# Altium PCB PCI Express Mini L1.PCBDOC (part 7 of 7)
Units mm, origin at the board's own origin, x right, y up, seen from the top; angles counter-clockwise.
Board outline 70 x 83.2 mm, 6 copper layers (TopLayer, Layer 1, Layer 2, Layer 3, Layer 4, Bottom Layer), stack 0.914 mm thick; 402 components, 242 nets, 1301 pads, 522 vias.
Unrouted connection lines stored in the file: 225.
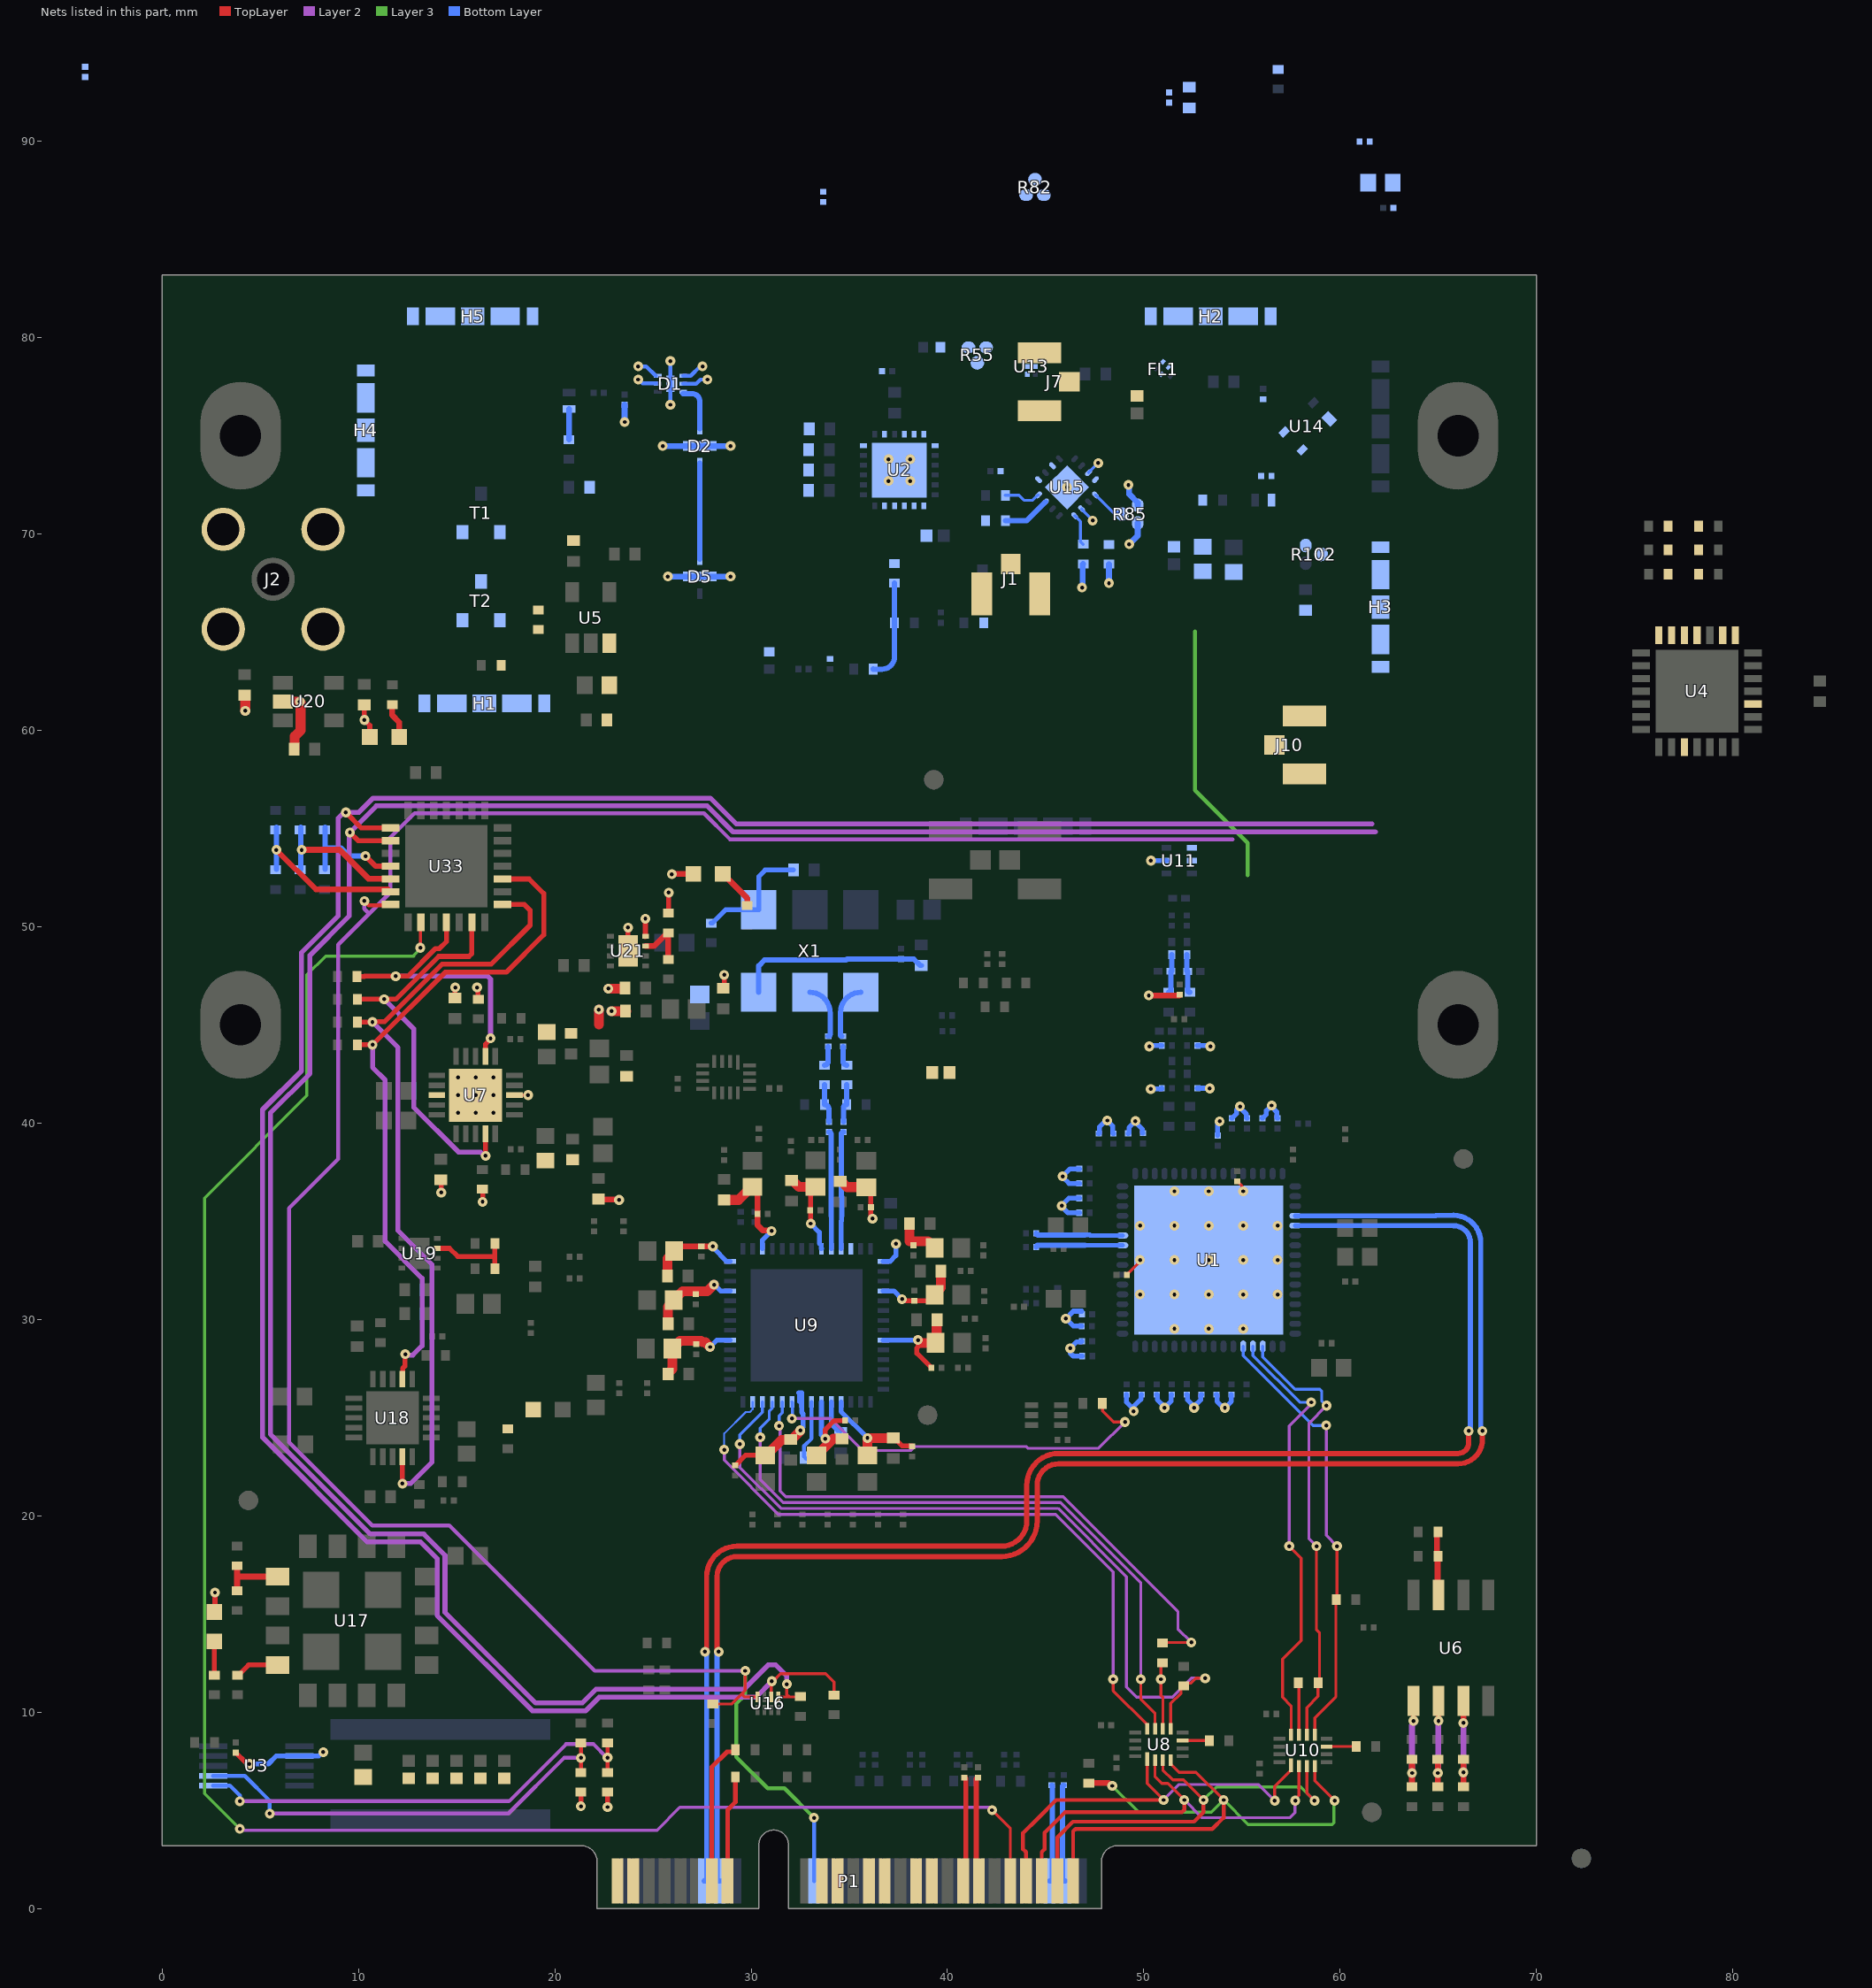
[diagram p8: the nets of this part, all layers, seen from the top]

## Via types
v1: diameter 0.5, hole 0.2, TopLayer to Bottom Layer, tented both sides, 311 vias
v2: diameter 0.5, hole 0.2, TopLayer to Bottom Layer, 211 vias

## Nets (pads, with @x,y where several pads share a name; then routed paths per layer and width w, separated by ;. In a path a pad name is that pad's centre, name@x,y a point inside that pad or via, vN(x,y) a via of type N, cw(c..) or ccw(c..) an arc to the next point about the centre after c; other vN are vias at no path point) (continued)
NetC172_1: C172.1 U9.7 | length 3.1
  Bottom Layer w0.2: C172.1@32.803,22.912 32.701,23.013 32.701,23.53 32.701,23.556 33.081,23.936 U9.7@33.081,25.8
NetC173_1: C173.1 U9.5 | length 1.8
  Bottom Layer w0.25: U9.5@34.081,25.8 34.081,24.674 34.402,24.353 C173.1@34.552,24.353
  Bottom Layer w0.279: C173.1@34.552,24.353 C173.1@34.581,24.381
NetC175_2: C175.2 R90.1 | length 1.1
  Bottom Layer w0.268: C175.2@34.681,43.901 34.681,43.147 ccw(c34.876,43.147) R90.1@34.876,42.952
NetC176_1: C176.1 R79.1 R90.2 | length 2
  Bottom Layer w0.268: C176.1@34.706,40.063 34.706,40.778 cw(c34.866,40.778) R79.1@34.866,40.937 34.866,41.952 R90.2@34.876,41.952
NetC178_2: C178.2 R91.1 | length 1.1
  Bottom Layer w0.268: R91.1@33.733,42.954 ccw(c33.733,43.15) 33.928,43.15 C178.2@33.928,43.901
NetC179_1: C179.1 R84.2 R91.2 | length 2
  Bottom Layer w0.268: R91.2@33.733,41.954 R84.2@33.733,40.937 cw(c33.733,40.709) 33.961,40.709 C179.1@33.961,40.063
NetC259_2: C259.2 L3.2 R102.2 U14.3
NetD1_6: D1.6 D2.3 | length 2.5
  Bottom Layer w0.268: 26.533,77.142 26.983,77.142 cw(c26.983,76.735) 27.39,76.735 D2.3@27.39,75.35
NetD2_1: D2.1 D5.3 | length 4.9
  Bottom Layer w0.268: D5.3@27.39,68.708 D2.1@27.39,73.6
NetD3_1: D3.1 R77.1 | length 2.1
  TopLayer w0.3: D3.1@28.563,52.693 29.801,51.455 R77.1@29.801,51.08
NetD4_1: D4.1 R76.1 | length 1.8
  TopLayer w0.3: R76.1@11.724,61.315 11.724,60.767 12.082,60.409 D4.1@12.082,59.659
NetD7_1: D7.1 R80.1 | length 1.7
  TopLayer w0.25: R80.1@2.664,11.885 2.664,13.598 D7.1@2.669,13.603
NetD8_1: D8.1 R78.1
NetJ1_2: J1.2 R100.1
NetJ7_2: J7.2 R55.3
NetJ10_2: J10.2 R102.3
NetL1_2: L1.2 R55.1
NetL2_2: L2.2 R31.2 | length 1.6
  Bottom Layer w0.3: R31.2@20.723,74.803 L2.2@20.723,76.368
NetR1_2: R1.2 R2.1 R5.2 | length 2
  Bottom Layer w0.268: R2.1@51.375,46.775 R5.2@51.375,47.729 ; R5.2@51.42,47.774 R1.2@51.42,48.573
  Bottom Layer w0.269: R2.1@51.259,46.658 ccw(c51.259,46.775) R2.1@51.375,46.775 ; R5.2@51.375,47.729 ccw(c51.375,47.774) R5.2@51.42,47.774
NetR9_1: R9.1 R10.2 R11.1 | length 2
  Bottom Layer w0.268: R9.1@52.195,47.758 R10.2@52.195,48.573 ; R11.1@52.229,46.773 R9.1@52.229,47.724
  Bottom Layer w0.269: R9.1@52.195,47.758 ccw(c52.229,47.758) R9.1@52.229,47.724 ; R11.1@52.229,46.773 ccw(c52.343,46.773) R11.1@52.343,46.658
NetR18_1: R18.1 U10.7 | length 1.5
  TopLayer w0.15: U10.7@59.303,8.253 R18.1@60.809,8.253
NetR19_1: R19.1 R53.2 U19.3 | length 4.4
  TopLayer w0.25: U19.3@14.017,33.619 14.644,33.619 15.056,33.208 16.946,33.208 ; R19.1@16.946,32.582 16.946,33.208 ; R53.2@16.946,33.871 16.946,33.208
NetR20_2: R20.2 R27.1 U6.7 | length 3.2
  TopLayer w0.3: R20.2@64.923,19.175 64.923,17.943 64.964,17.902 64.964,16.016 U6.7@65.005,15.975
NetR21_1: R21.1 R119.2 U6.3 | length 5.1
  TopLayer w0.3: R119.2@66.275,6.195 v1(66.275,6.935) R21.1@66.275,7.608 ; v1(66.275,9.454) U6.3@66.275,10.575
  Layer 2 w0.3: v1(66.275,6.935) v1(66.275,9.454)
NetR22_1: R22.1 R28.2 U4.13
NetR23_1: R23.1 R25.2 U4.11
NetR24_1: R24.1 R26.2 U4.12
NetR29_2: R29.2 U10.11 | length 2.6
  TopLayer w0.15: U10.11@57.903,8.853 R29.2@57.903,11.492
NetR30_1: R30.1 R35.2 U33.13 | length 8.7
  TopLayer w0.279: v1(5.821,53.914) 7.837,51.898 11.513,51.898 U33.13@11.632,51.779
  Bottom Layer w0.279: R30.1@5.823,52.934 v1(5.821,53.914) ; v1@5.823,53.998 R35.2@5.823,55.061
NetR32_2: R32.2 T2.1 U5.3
NetR33_1: R33.1 R47.2 U33.11 | length 5.8
  TopLayer w0.279: v2(10.361,53.598) 10.88,53.079 U33.11@11.632,53.079
  Bottom Layer w0.279: R33.1@8.308,52.934 8.308,53.998 ; R47.2@8.308,55.061 8.308,53.998 ; v2(10.361,53.598) 9.517,53.598 9.118,53.998 8.308,53.998
NetR34_1: R34.1 R45.2 U33.12 | length 7.2
  TopLayer w0.3: v1(7.112,53.914) 9.045,53.914 10.515,52.444 11.617,52.444 U33.12@11.632,52.429
  Bottom Layer w0.279: R34.1@7.064,52.934 v1@7.064,53.914 ; v1@7.064,53.998 R45.2@7.064,55.061
NetR40_2: R40.2 R81.1 R86.1 | length 5.2
  Bottom Layer w0.268: R40.2@36.227,63.12 36.227,63.115 36.677,63.115 ccw(c36.677,63.74) 37.302,63.74 R86.1@37.302,65.475 R81.1@37.302,67.493
NetR49_2: R49.2 T1.1 T2.3
NetR54_1: R54.1 R70.2 U6.1 | length 5.1
  TopLayer w0.25: v1(63.735,9.558) U6.1@63.735,10.575
  TopLayer w0.3: R70.2@63.656,6.195 v1(63.656,6.902) R54.1@63.656,7.608
  Layer 2 w0.3: v1(63.656,6.902) 63.656,9.321 63.735,9.4 v1(63.735,9.558)
NetR55_2: R55.2 U13.5
NetR56_1: R56.1 R68.2 U21.3 | length 2.8
  TopLayer w0.3: U21.3@24.631,49.009 25.056,49.009 25.731,49.684 R68.2@25.781,49.684 R56.1@25.781,48.334
NetR61_1: R61.1 R63.2 U17.13 | length 3.4
  TopLayer w0.2: R63.2@3.827,16.131 R63.2@3.827,16.181 ; R61.1@3.827,17.456 R61.1@3.827,17.506
  TopLayer w0.3: R63.2@3.827,16.181 R61.1@3.827,17.456 ; 3.828,16.935 3.86,16.903 U17.13@5.88,16.903
NetR62_1: R62.1 U17.16 | length 2.3
  TopLayer w0.25: R62.1@3.842,11.885 3.892,11.885 4.41,12.403 U17.16@5.88,12.403
NetR69_1: R69.1 R71.2 U6.2 | length 5.1
  TopLayer w0.25: v1(65.005,9.558) U6.2@65.005,10.575
  TopLayer w0.3: R71.2@64.973,6.195 v1(64.973,6.902) R69.1@64.973,7.608
  Layer 2 w0.3: v1(64.973,6.902) 64.989,6.918 64.989,9.438 65.005,9.454 v1(65.005,9.558)
NetR74_1: R74.1 U9.9 | length 21
  TopLayer w0.15: R74.1@47.893,25.724 47.893,25.336 48.452,24.777 v1(49.043,24.777)
  Layer 2 w0.15: v1(32.077,24.951) 34.04,24.951 35.666,23.326 38.15,23.326 38.354,23.53 43.999,23.53 44.09,23.439 47.705,23.439 v1(49.043,24.777)
  Bottom Layer w0.15: U9.9@32.081,25.8 32.104,25.777 v1@32.104,24.928
NetR75_1: R75.1 U9.10 | length 30.8
  TopLayer w0.15: R75.1@50.955,13.519 50.987,13.551 v1(52.42,13.551)
  Layer 2 w0.15: v2(31.426,24.58) 31.476,24.531 31.476,23.53 31.476,21.261 31.762,20.975 45.885,20.975 51.734,15.126 51.734,14.236 v1(52.42,13.551)
  Bottom Layer w0.15: v2(31.426,24.58) 31.426,25.095 31.581,25.25 U9.10@31.581,25.8
NetR81_2: R81.2 U2.4
NetR93_1: R93.1 R103.1 U15.16 | length 1.6
  Bottom Layer w0.15: U15.16@46.478,70.925 46.771,70.632 46.771,69.616 R93.1@46.913,69.475
NetR100_2: R100.2 U15.3 | length 2.4
  Bottom Layer w0.268: R100.2@42.944,70.681 44.042,70.681 U15.3@44.993,71.632
NetR106_2: R106.2 U15.4 | length 1.9
  Bottom Layer w0.15: R106.2@42.944,71.964 43.644,71.964 43.895,71.713 44.345,71.713 44.618,71.986 U15.4@44.639,71.986
NetR111_2: R111.2 R129.1 U3.2 | length 22.6
  TopLayer w0.2: R129.1@21.333,6.925 v2(21.333,7.673) R111.2@21.333,8.444
  Layer 2 w0.2: v2(5.488,4.839) 17.639,4.839 20.473,7.673 v2(21.333,7.673)
  Bottom Layer w0.2: U3.2@2.605,6.763 2.611,6.757 4.217,6.757 5.488,5.486 v2(5.488,4.839)
NetR112_2: R112.2 R130.1 U3.1 | length 23.7
  TopLayer w0.2: R130.1@22.691,6.875 R130.1@22.691,6.925 v2(22.691,7.684) R112.2@22.691,8.444 R112.2@22.691,8.494
  Layer 2 w0.2: v2(3.965,5.463) 17.674,5.463 20.579,8.369 21.975,8.369 22.66,7.684 v2(22.691,7.684)
  Bottom Layer w0.2: U3.1@2.605,6.263 3.46,6.263 3.965,5.758 v2(3.965,5.463)
NetR145_1: R145.1 U8.7 | length 1.4
  TopLayer w0.15: U8.7@51.97,8.558 53.332,8.558 R145.1@53.337,8.553
O1_N: C189.2 P1.48 | length 5
  Bottom Layer w0.268: P1.48@45.2,1.4 ccw(c45.2,1.536) 45.336,1.536 45.336,6.253 ccw(c45.306,6.253) C189.2@45.306,6.283
O1_P: C188.2 P1.50 | length 5
  Bottom Layer w0.268: C188.2@45.93,6.283 ccw(c45.93,6.218) 45.864,6.218 45.864,1.536 ccw(c46,1.536) P1.50@46,1.4
O3_N: C227.2 P1.39 | length 5.6
  TopLayer w0.268: P1.39@41.469,1.531 ccw(c41.6,1.531) P1.39@41.6,1.4 cw(c41.6,1.536) 41.464,1.536 41.464,6.573 cw(c41.564,6.573) C227.2@41.564,6.673
O3_P: C228.2 P1.37 | length 5.4
  TopLayer w0.268: P1.37@40.8,1.4 ccw(c40.8,1.536) 40.936,1.536 40.936,6.587 ccw(c40.85,6.587) C228.2@40.85,6.673
O8_N: C185.2 U1.59 | length 4.5
  Bottom Layer w0.24: 47.006,34.303 47.234,34.303 cw(c47.234,34.275) 47.262,34.275 U1.59@48.908,34.275
  Bottom Layer w0.268: C185.2@44.518,34.389 ccw(c44.604,34.389) 44.604,34.303 47.006,34.303
O8_P: C183.2 U1.58 | length 4.4
  Bottom Layer w0.24: 47.006,33.775 U1.58@48.908,33.775
  Bottom Layer w0.268: C183.2@44.518,33.693 cw(c44.6,33.693) 44.6,33.775 47.006,33.775
OSCIN_N: C179.2 U9.38 | length 6
  Bottom Layer w0.24: U9.38@34.081,33.6 34.081,35.262
  Bottom Layer w0.268: C179.2@33.961,39.543 cw(c33.961,39.435) 34.07,39.435 34.07,35.66 ccw(c34.109,35.66) 34.081,35.632 34.081,35.262
OSCIN_P: C176.2 U9.39 | length 6
  Bottom Layer w0.24: U9.39@34.581,33.6 34.581,35.006 ccw(c34.581,35.034) 34.609,35.034 34.609,35.262
  Bottom Layer w0.268: 34.609,35.262 34.609,36.242 ccw(c34.57,36.242) 34.598,36.27 34.598,39.435 cw(c34.706,39.435) C176.2@34.706,39.543
PER0_N: P1.21
PER0_P: P1.19
PER1_N: P1.27
PER1_P: P1.25
PER2_N: P1.33
PER2_P: P1.31
PERST2#: P1.43 U33.16 | length 97
  TopLayer w0.15: v1(13.154,48.928) 13.168,48.942 13.168,50.215 U33.16@13.182,50.229 ; v1(42.268,5.01) 42.288,5.01 43.2,4.098 P1.43@43.2,1.4
  Layer 2 w0.15: v1(3.965,4.057) 4.033,3.99 25.21,3.99 26.37,5.15 42.128,5.15 v1(42.268,5.01)
  Layer 3 w0.15: v1(3.965,4.057) 2.172,5.851 2.172,36.186 7.377,41.392 7.377,47.547 8.335,48.504 12.837,48.504 12.837,48.573 13.154,48.89 v1(13.154,48.928)
PERST#: P1.18 R72.2 U4.14 U16.8 U33.14 | length 137.5
  TopLayer w0.15: R72.2@28.05,10.419 29.017,10.419 29.517,10.92 29.587,10.849 ; v1(29.701,12.107) 29.7,12.105 29.7,11.103 29.587,10.99 29.587,10.849 ; U16.8@30.326,10.779 29.657,10.779 29.587,10.849
  TopLayer w0.2: v1(10.304,51.309) 10.526,51.087 11.591,51.087 U33.14@11.632,51.129
  Layer 2 w0.2: v1(10.304,51.309) 10.304,50.911 10.552,50.663 ; v1(29.701,12.107) 22.031,12.107 14.634,19.504 10.706,19.504 6.475,23.736 6.475,35.667 8.977,38.169 8.977,49.088 10.552,50.663 ; 54.515,54.452 28.919,54.452 27.597,55.774 12.86,55.774 11.632,54.547 11.632,51.744 10.552,50.663
  Layer 3 w0.2: v1(29.701,12.107) 29.701,10.881 29.236,10.416 29.236,7.726 30.84,6.123 31.704,6.123 v1(33.201,4.625) ; 52.603,65.036 52.603,56.947 55.286,54.264 55.286,52.63
  Bottom Layer w0.2: P1.18@33.2,1.4 33.201,1.401 v1(33.201,4.625)
PG_1V8_1: R52.2 U18.17 U33.24 | length 35.1
  TopLayer w0.25: R52.2@9.977,43.984 v2(10.721,43.984) 14.424,47.687 17.542,47.687 19.438,49.583 19.438,51.688 18.696,52.429 U33.24@17.332,52.429 ; U18.17@12.242,26.962 12.257,26.977 12.257,27.515 12.367,27.625 12.367,28.208 v1(12.388,28.23)
  Layer 2 w0.25: v2(10.721,43.984) 10.721,42.833 11.363,42.191 11.363,33.973 13.242,32.094 13.242,28.659 12.769,28.186 12.433,28.186 v1(12.388,28.23)
PG_1V25_0: R37.2 U7.17 U33.18 | length 15.2
  TopLayer w0.25: R37.2@9.961,47.48 9.971,47.471 10.306,47.471 10.315,47.48 12.52,47.48 13.927,48.887 14.131,48.887 14.482,49.239 U33.18@14.482,50.229 ; U7.17@16.47,43.398 16.47,44.007 16.732,44.269 v2(16.732,44.31)
  Layer 2 w0.25: v2(11.898,47.48) 16.586,47.48 16.732,47.334 v2(16.732,44.31)
PG_2V5_0: R38.2 U7.9 U33.20 | length 20.3
  TopLayer w0.25: R38.2@9.977,46.306 v2(11.316,46.306) 11.911,46.306 14.093,48.487 15.636,48.487 15.782,48.634 U33.20@15.782,50.229 ; U7.9@16.47,39.448 16.474,39.444 16.474,38.336 v2(16.478,38.332)
  Layer 2 w0.25: v2(11.316,46.306) 12.818,44.804 12.818,40.804 15.098,38.523 16.22,38.523 16.411,38.332 v2(16.478,38.332)
PG_3V3_1: R42.2 U18.9 U33.22 | length 40.1
  TopLayer w0.25: R42.2@9.974,45.148 v2(10.718,45.148) 10.741,45.171 11.343,45.171 14.259,48.087 16.763,48.087 18.749,50.074 18.749,50.836 18.456,51.129 U33.22@17.332,51.129 ; U18.9@12.242,23.012 12.244,23.01 v1(12.244,21.641)
  Layer 2 w0.25: v2(10.718,45.148) 12.019,43.846 12.019,34.525 13.741,32.803 13.741,22.721 12.661,21.641 v1(12.244,21.641)
PGND: C37.1 C44.1 C48.1 C60.1 C70.1 D7.2 FB5.1 FB6.1 FB11.1 FB13.1 FB14.1 FB30.1 P1.1 P1.3 R129.2 R130.2 U3.7 | length 8.2
  TopLayer w0.25: D7.2@2.669,15.103 2.697,15.131 v1(2.697,16.094) ; C44.1@3.752,7.935 3.762,7.935 4.286,7.411 4.397,7.411 v1(4.445,7.363) ; v2(21.333,5.206) R129.2@21.333,5.925 ; v2(22.691,5.168) R130.2@22.691,5.925
  TopLayer w0.5: v1(4.24,60.996) C60.1@4.24,61.747
  Bottom Layer w0.25: v1(4.445,7.363) 5.413,7.363 5.813,7.763 U3.7@7.005,7.763 7.976,7.763 8.179,7.966 v1@8.246,7.966
  other v1: 8.212,7.966
Q: R85.3 U4.24 U15.13 | length 1.8
  Bottom Layer w0.15: U15.13@47.538,71.986 48.452,71.073 48.832,71.073 R85.3@48.898,71.006
Q\: R39.1 R82.3 U2.19 U15.12
RFGND: C1.2 C2.2 C4.1 C7.1 C8.1 C9.1 C10.1 C11.2 C12.2 C13.2 C14.2 C24.1 C26.1 C27.1 C30.1 C31.1 C33.1 C42.1 C46.1 C47.2 C51.2 C61.1 C63.1 C66.1 C67.1 C68.1 C69.1 C71.1 C72.1 C77.1 C78.1 C83.2 C84.1 C85.1 C99.1 C100.1 C101.1 C102.1 C103.1 C104.1 C105.1 C106.1 C107.1 C108.1 C109.1 C110.1 C111.1 C113.1 C114.1 C115.1 C116.1 C117.1 C118.1 C119.1 C120.1 C121.1 C122.1 C123.1 C124.1 C125.1 C252.1 C253.1 C256.1 C257.1 C258.1 C259.1 D1.2 D1.3 D1.4 D1.5 D1.7 D2.2 D3.2 D4.2 D5.2 FB11.2 FL1.B FL1.C FL1.E H1.1 H2.1 H3.1 H4.1 H5.1 J1.1 J1.3 J2.MH J7.1 J7.3 J10.1 J10.3 L4.1 R58.1 R60.1 R68.1 R82.1 R85.1 R87.1 R88.2 R103.2 T1.2 T2.2 U1.65 U2.1 U2.3 U2.5 U2.12 U2.14 U2.16 U2.17 U2.18 U2.25 U7.3 U7.13 U7.21 U11.2 U11.5 U13.1 U13.4 U14.2 U14.4 U15.11 U15.17 U20.2 U21.4 U21.9 | length 62
  TopLayer w0.15: v1(10.304,60.526) v1@10.421,60.409 ; U7.13@17.945,41.423 v1(18.64,41.423) ; C121.1@49.128,32.275 49.128,32.285 49.808,32.965 v2(49.808,33.025) ; C69.1@54.753,37.027 54.763,37.027 54.991,36.798 54.991,36.592 v2(55.058,36.525)
  TopLayer w0.25: v1(10.304,60.526) C61.1@10.304,61.29 ; v1@10.421,60.409 10.582,60.248 D4.2@10.582,59.659 ; v2(14.218,36.462) 14.22,36.464 14.22,37.063 C51.2@14.227,37.071 ; C47.2@14.916,46.368 14.924,46.376 14.924,46.897 v2(14.932,46.905) ; v2(16.045,46.905) 16.081,46.869 16.081,46.343 R58.1@16.116,46.307 ; v2(16.327,35.989) 16.334,35.996 16.334,36.596 R60.1@16.341,36.603 ; U21.9@23.729,49.046 23.73,49.048 v2(23.732,49.96) v2(23.732,49.96) ; U21.4@24.614,49.496 24.615,49.498 24.615,50.408 v2(24.617,50.41) ; R68.1@25.803,50.82 25.805,50.821 25.805,51.732 v2(25.806,51.734) ; C78.1@28.613,46.8 28.631,46.818 v2(28.631,47.549)
  TopLayer w0.3: C68.1@22.227,36.133 22.25,36.11 23.254,36.11 v2(23.276,36.088) ; v1(25.962,52.668) 25.975,52.68 27.05,52.68 D3.2@27.063,52.693 ; v2(50.25,46.5) 51.785,46.5 ccw(c51.785,46.54) C4.1@51.822,46.526
  TopLayer w0.5: U20.2@6.268,61.462 v1(7.019,61.462) 7.058,61.422 7.058,59.996 6.755,59.693 6.755,59.074 C63.1@6.73,59.049 ; 22.246,45.03 v1(22.246,45.781) ; v1(22.726,46.851) C66.1@23.477,46.851 ; v1(22.891,45.702) C77.1@23.642,45.702
  Bottom Layer w0.15: U15.11@47.185,73.117 v1(47.68,73.612)
  Bottom Layer w0.2: v1(24.249,77.861) 24.277,77.861 24.461,77.677 D1.2@25.21,77.677 ; v1(24.249,78.532) 24.654,78.532 D1.3@25.14,78.047 ; v1(25.89,76.577) D1.7@25.89,77.647 v1(25.89,78.8) ; D1.5@26.54,77.647 27.204,77.647 27.418,77.861 v1(27.775,77.861) ; D1.4@26.54,78.047 26.927,78.047 27.412,78.532 v1(27.525,78.532)
  Bottom Layer w0.25: v1(45.821,35.784) v1@45.798,35.784 ; C116.1@46.717,35.432 46.133,35.432 45.782,35.784 v1@45.798,35.784 ; C102.1@46.717,36.178 46.192,36.178 v1@45.798,35.784 ; C100.1@46.717,36.924 46.192,36.924 45.863,37.252 v1(45.863,37.287) 46.245,37.669 C113.1@46.717,37.669 ; C99.1@46.836,29.656 46.412,29.656 v1(46.029,30.04) 46.409,30.419 C118.1@46.847,30.419 ; C101.1@46.847,28.893 46.847,28.883 46.822,28.858 46.581,28.858 v1(46.253,28.53) 46.253,28.289 46.409,28.133 C117.1@46.857,28.133 ; C114.1@47.698,39.472 47.708,39.472 47.733,39.497 47.733,39.794 48.068,40.128 v1(48.135,40.128) 48.419,39.845 48.419,39.493 48.444,39.468 C115.1@48.454,39.468 ; C120.1@49.116,26.172 49.116,25.789 v1@49.425,25.481 ; C103.1@49.204,39.473 49.214,39.473 49.239,39.498 49.239,39.767 v1(49.574,40.102) 49.574,40.034 49.915,39.692 49.915,39.505 49.94,39.48 C125.1@49.95,39.48 ; v1(49.484,25.321) 49.436,25.369 49.436,25.47 v1@49.425,25.481 ; C119.1@49.887,26.172 49.877,26.172 49.852,26.147 49.852,25.937 49.425,25.51 v1@49.425,25.481 ; v1(50.275,43.901) cw(c50.323,43.901) 50.323,43.949 C1.2@50.916,43.949 ; v1(50.35,41.736) 50.878,41.736 ccw(c50.878,41.775) C2.2@50.916,41.775 ; C111.1@50.652,26.176 50.662,26.176 50.687,26.151 50.687,25.924 51.05,25.56 v1(51.05,25.5) 51.379,25.828 51.379,26.144 51.404,26.169 C123.1@51.414,26.169 ; C122.1@52.183,26.181 52.193,26.181 52.218,26.156 52.218,25.908 v1@52.558,25.567 ; v1(52.558,25.5) v1@52.558,25.567 ; C8.1@52.726,41.775 53.354,41.775 v1(53.354,41.763) ; C7.1@52.726,43.949 53.343,43.949 cw(c53.343,43.901) v1(53.391,43.901) ; C108.1@52.938,26.176 52.928,26.176 52.903,26.151 52.903,25.912 v1@52.558,25.567 ; C109.1@53.697,26.172 53.7,26.172 53.725,26.147 53.725,25.832 54.057,25.5 v1(54.125,25.5) 54.13,25.5 54.459,25.829 C110.1@54.459,26.169 ; C124.1@53.76,39.366 53.76,39.971 53.857,40.068 v1(53.857,40.091) ; C104.1@54.483,40.243 54.493,40.243 54.72,40.47 54.72,40.666 v1(54.901,40.846) 54.901,40.779 55.223,40.456 55.223,40.268 55.248,40.243 C105.1@55.258,40.243 ; C106.1@56.033,40.243 56.043,40.243 56.241,40.441 56.241,40.63 v1(56.507,40.896) 56.507,40.828 56.773,40.561 56.773,40.268 56.798,40.243 C107.1@56.808,40.243
  Bottom Layer w0.268: v2(50.356,53.364) U11.5@51.148,53.364
  Bottom Layer w0.3: v1(23.56,75.7) C252.1@23.56,76.577 ; v1(25.499,74.475) D2.2@27.39,74.475 v1(28.95,74.475) ; v1(25.757,67.833) D5.2@27.39,67.833 v1(28.95,67.833) ; v1@25.89,76.494 v1(25.89,76.577) ; v1(48.225,67.493) R103.2@48.225,68.462 ; v1(49.216,72.493) 49.254,72.455 49.254,72.019 49.686,71.587 R85.1@49.686,71.456
  other v1: 46.089,72.375
  other v2: 51.558,29.525 53.308,29.525 55.058,29.525 49.808,31.275 51.558,31.275 53.308,31.275 55.058,31.275 56.808,31.275 51.558,33.025 53.308,33.025 55.058,33.025 56.808,33.025 49.808,34.775 51.558,34.775 53.308,34.775 55.058,34.775 56.808,34.775 51.558,36.525 53.308,36.525 15.07,40.523 15.97,40.523 16.87,40.523 15.07,41.423 15.97,41.423 16.87,41.423 15.07,42.323 15.97,42.323 16.87,42.323 37.002,72.7 38.102,72.7 37.002,73.8 38.102,73.8
RST: U4.3 U15.15 | length 0.8
  Bottom Layer w0.15: U15.15@46.831,71.279 46.831,71.261 47.397,70.695 v1(47.397,70.677)
SCK: R44.1 U4.8 U16.6 U33.8 | length 129
  TopLayer w0.15: U16.6@31.026,10.779 v1@31.026,11.478 ; v1(31.052,11.576) 31.026,11.55 v1@31.026,11.478 ; v1@31.087,11.54 31.501,11.953 ; R44.1@34.221,10.874 34.221,11.526 33.794,11.953 31.501,11.953 ; v1@31.026,11.478 31.501,11.953
  TopLayer w0.25: v1(9.361,55.819) 10.152,55.029 U33.8@11.632,55.029
  Layer 2 w0.25: v1(31.052,11.576) 30.239,10.763 22.261,10.763 21.566,10.068 18.867,10.068 14.012,14.922 14.012,17.821 13.164,18.669 10.446,18.669 5.12,23.994 5.12,40.68 7.104,42.664 7.104,48.683 8.978,50.557 8.978,55.533 9.25,55.804 9.346,55.804 v1(9.361,55.819) 10.022,55.819 10.752,56.549 27.927,56.549 29.248,55.227 61.619,55.227
SDA: R43.1 U4.9 U16.5 U33.9 | length 124.8
  TopLayer w0.15: U16.5@31.376,10.779 31.937,10.779 ; v1(31.817,11.428) 31.817,10.9 31.937,10.779 ; R43.1@32.509,10.79 32.499,10.779 31.937,10.779
  TopLayer w0.25: v1(9.568,54.8) 9.989,54.379 U33.9@11.632,54.379
  Layer 2 w0.25: v1(31.817,11.428) 31.817,11.845 31.259,12.403 30.866,12.403 29.627,11.163 22.096,11.163 21.4,10.468 19.032,10.468 14.412,15.088 14.412,17.987 13.33,19.069 10.611,19.069 5.52,24.16 5.52,40.514 7.531,42.525 7.531,48.544 9.542,50.555 9.542,54.774 v1(9.568,54.8) 10.917,56.149 27.761,56.149 29.083,54.827 61.785,54.827
SMCLK: P1.15 R51.1 | length 5.5
  TopLayer w0.234: P1.15@28.8,1.4 28.8,5.025 29.2,5.425 R51.1@29.2,6.705
SMDAT: P1.13 R50.1 | length 7.4
  TopLayer w0.234: P1.13@28,1.4 28,7.207 28.776,7.983 29.096,7.983 R50.1@29.2,8.088
SPI__LMK_MOSI: U8.11 U9.11 | length 33.5
  TopLayer w0.15: v2(49.842,11.678) 49.842,10.665 50.57,9.937 U8.11@50.57,9.158
  Layer 2 w0.15: v2(30.462,23.995) 30.462,21.851 31.638,20.675 45.761,20.675 49.842,16.593 v2(49.842,11.678)
  Bottom Layer w0.15: v2(30.462,23.995) 30.462,24.463 30.926,24.927 30.926,25.345 31.081,25.5 U9.11@31.081,25.8
SPI_CLK_AD: U1.36 U10.12 | length 22.6
  TopLayer w0.15: v2(57.403,18.455) 58.008,17.849 58.008,13.646 57.06,12.698 57.06,10.757 57.503,10.315 U10.12@57.503,8.853
  Layer 2 w0.15: v2(57.403,18.455) 57.403,24.581 58.521,25.7 v2(58.521,25.781)
  Bottom Layer w0.15: U1.36@55.558,28.625 55.558,28.156 57.934,25.781 v2(58.521,25.781)
SPI_CLK_MB: P1.45 U8.1 U10.1 | length 21.3
  TopLayer w0.15: U8.1@50.17,7.608 50.17,6.367 v2(51.008,5.529) ; v2(56.664,5.493) 56.664,6.215 57.503,7.053 U10.1@57.503,7.303
  TopLayer w0.2: P1.45@44,1.4 44,2.876 43.85,3.026 43.85,3.845 44.582,4.577 45.534,5.529 v2(51.008,5.529)
  Layer 2 w0.15: v2(51.008,5.529) 51.798,6.32 55.837,6.32 v2(56.664,5.493)
SPI_CS_AD: R36.2 U1.37 U10.9 | length 22.6
  TopLayer w0.15: U10.9@58.703,8.853 58.703,9.701 59.778,10.777 R36.2@59.778,15.728 ; R36.2@59.804,15.728 59.835,15.759 v2(59.835,18.455)
  Layer 2 w0.15: v2(59.29,24.603) 59.29,19 v2(59.835,18.455)
  Bottom Layer w0.15: U1.37@55.058,28.625 55.058,28.156 58.612,24.603 v2(59.29,24.603)
SPI_LMK_CLK: U8.12 U9.13 | length 34.6
  TopLayer w0.15: v2(48.44,11.678) 48.44,11.089 50.17,9.358 U8.12@50.17,9.158
  Layer 2 w0.15: v2(28.631,23.362) 28.631,22.833 31.389,20.075 45.512,20.075 48.44,17.147 v2(48.44,11.678)
  Bottom Layer w0.1: v2(28.631,23.362) 28.631,24.188 29.73,25.287 29.94,25.287 30.083,25.43 30.083,25.798 U9.13@30.081,25.8
SPI_LMK_CS: R73.1 U8.9 U9.12 | length 39.9
  TopLayer w0.15: U8.9@51.37,9.158 51.37,10.444 51.896,10.97 51.896,11.182 51.958,11.244 52.17,11.244 52.17,11.416 52.233,11.478 52.404,11.478 52.656,11.73 v2(53.125,11.73)
  Layer 2 w0.15: v2(29.425,23.65) 29.425,22.464 31.514,20.375 45.637,20.375 49.121,16.891 49.121,11.275 49.633,10.763 51.452,10.763 52.42,11.73 v2(53.125,11.73)
  Bottom Layer w0.1: U9.12@30.581,25.8 U9.12@30.614,25.767
  Bottom Layer w0.15: v2(29.425,23.65) 29.425,24.117 30.571,25.263 30.571,25.789 U9.12@30.581,25.8
SPI_LMK_MISO: R75.2 U8.10 | length 3.4
  TopLayer w0.15: R75.2@50.955,12.519 50.87,12.434 v2(50.87,11.678) 50.87,10.863 50.97,10.763 U8.10@50.97,9.158
SPI_MISO_MB: P1.49 U8.3 U10.3 | length 22.2
  TopLayer w0.15: U8.3@50.97,7.558 50.97,7.053 51.47,6.553 52.016,6.553 v2(53.04,5.529) ; U10.3@58.303,7.253 58.303,5.887 v2(58.697,5.493)
  TopLayer w0.2: P1.49@45.6,1.4 45.6,3.631 46.393,4.424 52.559,4.424 53.04,4.905 v2(53.04,5.529)
  Layer 3 w0.15: v2(53.04,5.529) 53.704,6.193 57.996,6.193 v2(58.697,5.493)
SPI_MOSI_AD: R29.1 U1.35 U10.10 | length 22.7
  TopLayer w0.15: U10.10@58.303,8.853 58.303,10.23 58.875,10.802 R29.1@58.875,11.492 58.95,11.567 58.95,14.034 58.79,14.194 v2(58.79,18.455)
  Layer 2 w0.15: v2(58.79,18.455) 58.408,18.837 58.408,24.719 v2(59.3,25.611)
  Bottom Layer w0.15: U1.35@56.058,28.625 56.058,28.096 57.707,26.447 58.968,26.447 59.056,26.359 59.056,25.855 v2(59.3,25.611)
SPI_MOSI_MB: P1.47 U8.2 U10.2 | length 22
  TopLayer w0.15: U8.2@50.57,7.558 50.57,6.705 50.908,6.367 51.221,6.367 v2(52.058,5.529) ; v2(57.715,5.493) 57.715,5.574 57.903,5.761 U10.2@57.903,7.253
  TopLayer w0.2: P1.47@44.8,1.4 44.8,2.876 44.95,3.026 44.95,3.863 45.992,4.905 51.941,4.905 52.058,5.022 v2(52.058,5.529)
  Layer 2 w0.15: v2(52.058,5.529) 52.962,4.625 57.436,4.625 57.691,4.88 57.691,5.469 v2(57.715,5.493)
SPI_nCS_1_MB: P1.51 R48.1 U8.4 U10.4 | length 32.3
  TopLayer w0.15: U8.4@51.37,7.558 51.37,7.358 51.794,6.935 52.655,6.935 v2(54.061,5.529) ; U10.4@58.703,7.253 58.703,6.507 v2(59.717,5.493)
  TopLayer w0.2: P1.51@46.4,1.4 46.4,3.936 46.517,4.053 53.489,4.053 54.061,4.625 v2(54.061,5.529)
  TopLayer w0.3: R48.1@47.201,6.393 48.208,6.393 48.353,6.249 v2(48.393,6.249)
  Layer 3 w0.15: v2(48.393,6.249) 49.737,4.905 53.437,4.905 v2(54.061,5.529) 55.313,4.277 59.592,4.277 59.68,4.365 59.68,5.456 v2(59.717,5.493)
SYNC_N: P1.12 U1.21 | length 78.8
  TopLayer w0.268: v1(27.65,13.078) ccw(c27.65,13.164) 27.736,13.164 27.736,16.903 cw(c29.288,16.903) 29.288,18.455 42.762,18.455 ccw(c42.762,19.732) 44.039,19.732 44.039,21.558 cw(c45.656,21.558) 45.656,23.175 66,23.175 ccw(c66,23.718) 66.543,23.718 v1(66.543,24.318)
  Bottom Layer w0.24: U1.21@57.708,34.775 65.775,34.775
  Bottom Layer w0.268: P1.12@27.6,1.4 ccw(c27.6,1.536) 27.736,1.536 27.736,12.992 ccw(c27.65,12.992) v1(27.65,13.078) ; 65.775,34.775 cw(c65.775,33.921) 66.629,33.921 66.629,24.404 cw(c66.543,24.404) v1(66.543,24.318)
SYNC_P: P1.14 U1.20 | length 79.8
  TopLayer w0.268: v1(28.35,13.078) cw(c28.35,13.164) 28.264,13.164 28.264,16.903 cw(c29.288,16.903) 29.288,17.927 42.762,17.927 ccw(c42.762,19.732) 44.567,19.732 44.567,21.558 cw(c45.656,21.558) 45.656,22.647 66,22.647 ccw(c66,23.89) 67.243,23.89 v1(67.243,24.318)
  Bottom Layer w0.24: U1.20@57.708,35.275 64.871,35.275 cw(c64.899,35.275) 64.899,35.303 65.775,35.303
  Bottom Layer w0.268: v1(28.35,13.078) ccw(c28.35,12.992) 28.264,12.992 28.264,1.536 ccw(c28.4,1.536) P1.14@28.4,1.4 ; 65.775,35.303 cw(c65.775,33.921) 67.157,33.921 67.157,24.404 ccw(c67.243,24.404) v1(67.243,24.318)
Tor_RF_50: C32.2 U11.1
VC_CTRL: C177.2 R89.2 X1.1 | length 6.3
  Bottom Layer w0.25: R89.2@27.969,50.179 28.019,50.179 28.701,50.86 X1.1@30.386,50.86 30.386,52.549 30.719,52.881 C177.2@32.157,52.881
VC_SUPP: C209.2 C210.2 FB26.2 X1.6 | length 9.9
  Bottom Layer w0.268: X1.6@30.386,46.66 30.386,48.009 30.676,48.299 34.841,48.299 34.896,48.354 C209.2@37.639,48.354 38.284,48.354 38.614,48.024 C210.2@38.664,48.024
VCC_3V3_LNA: C26.2 C27.2 C83.1 C84.2 FB1.2 R49.1 R82.2 R85.2 R93.2 U13.2 U15.5 U15.7 | length 2.5
  Bottom Layer w0.3: v1(46.853,67.268) 46.883,67.298 46.883,68.445 R93.2@46.913,68.475 46.913,68.465 R93.2@46.891,68.443 ; v1(49.254,69.475) 49.686,69.907 R85.2@49.686,70.556
VCC_5_ATT: C9.2 C10.2 FB2.2 U2.2
VCC_AMP_5: C33.2 FB3.2 R46.2
VCXO_OUT_N: C178.1 X1.5 | length 2.9
  Bottom Layer w0.268: X1.5@32.986,46.66 cw(c32.986,45.624) 34.022,45.624 34.022,44.514 cw(c33.928,44.514) C178.1@33.928,44.421
VCXO_OUT_P: C175.1 X1.4 | length 2.9
  Bottom Layer w0.268: C175.1@34.612,44.421 cw(c34.612,44.483) 34.55,44.483 34.55,45.624 cw(c35.586,45.624) X1.4@35.586,46.66
VDD_CORE: C152.2 C153.2 FB15.2 U9.8 | length 6.8
  TopLayer w0.25: C152.2@29.195,22.571 29.205,22.571 29.713,23.079 FB15.2@30.726,23.079
  TopLayer w0.255: v2@32.438,24.351 32.424,24.337 32.439,24.322 v2@32.439,24.315
  TopLayer w0.5: FB15.2@30.726,23.079 30.776,23.079 31.559,23.862 31.999,23.862 C153.2@32.024,23.887 32.074,23.887 32.502,24.315 v2(32.502,24.351)
  Bottom Layer w0.255: v2@32.472,24.348 v2@32.475,24.351 ; U9.8@32.479,25.807 32.479,26.215 32.434,26.259 32.574,26.259 32.574,25.807 U9.8@32.581,25.8 32.574,25.792 32.574,25.275 32.654,25.195 32.654,24.53 v2@32.475,24.351 ; v2(32.502,24.351) v2@32.475,24.351
VDD_IO: C160.2 C161.2 FB17.2 U9.31 | length 5.7
  TopLayer w0.3: FB17.2@30.111,36.74 30.322,36.529 C160.2@30.322,35.379 30.322,34.811 30.607,34.526 31.019,34.526 v2(31.042,34.502)
  TopLayer w0.5: C161.2@28.624,36.088 29.359,36.088 30.011,36.74 FB17.2@30.061,36.74 FB17.2@30.111,36.74
  Bottom Layer w0.25: U9.31@30.581,33.6 30.581,34.042 v2(31.042,34.502)
VDD_OSC: C217.2 C218.2 FB28.2 U9.37 | length 4.8
  TopLayer w0.25: FB28.2@33.029,36.498 33.023,36.492 33.023,34.89 v2(33.032,34.881)
  TopLayer w0.5: C218.2@32.056,37.075 32.106,37.075 32.136,37.045 32.136,37.04 32.429,36.748 FB28.2@33.229,36.748 ; FB28.2@33.029,36.498 33.029,36.548 FB28.2@33.229,36.748 ; FB28.2@33.279,36.748 FB28.2@33.229,36.748
  Bottom Layer w0.25: v2(33.032,34.881) 33.476,34.437 33.476,33.875 33.576,33.775 33.576,33.605 U9.37@33.581,33.6
VDD_PLL1: C156.2 C157.2 FB16.2 U9.40 | length 3.2
  TopLayer w0.25: FB16.2@35.866,36.738 36.101,36.503 C156.2@36.101,35.722 36.101,35.281 36.182,35.201 v1(36.182,35.134)
  TopLayer w0.5: C157.2@34.546,37.032 34.596,37.032 34.891,36.738 FB16.2@35.866,36.738
VDD_PLL2CORE: C174.2 C180.2 FB19.2 U9.6 | length 5.3
  TopLayer w0.25: 33.777,23.561 v1(33.777,23.926) 33.777,24.395 34.232,24.851 C174.2@34.786,24.851
  TopLayer w0.5: FB19.2@33.586,23.329 34.181,23.924 C180.2@34.629,23.924
  Bottom Layer w0.25: U9.6@33.581,25.8 33.581,24.121 v1(33.777,23.926)
VDD_PLL2OSC: C197.2 C198.2 FB23.2 U9.4 | length 5.7
  TopLayer w0.25: C198.2@37.237,23.964 37.287,23.964 37.687,23.564 38.169,23.564 C197.2@38.194,23.539
  TopLayer w0.5: FB23.2@35.925,23.079 v1(35.925,23.959) 37.232,23.959 C198.2@37.237,23.964
  Bottom Layer w0.25: U9.4@34.581,25.8 34.581,25.316 35.925,23.973 v1(35.925,23.959)
VDDO_1/2: C184.2 C190.2 FB20.2 U9.20 | length 4.8
  TopLayer w0.5: C190.2@25.773,27.22 25.773,27.27 25.981,27.479 FB20.2@25.981,28.514 25.981,28.564 26.181,28.764 26.231,28.764 26.381,28.914 27.447,28.914 27.524,28.837 27.666,28.837 v2(27.906,28.597)
  Bottom Layer w0.25: v2(27.906,28.597) 28.259,28.95 U9.20@28.931,28.95
VDDO_3/4: C201.2 C202.2 FB24.2 U9.25 | length 4.7
  TopLayer w0.5: C202.2@25.773,29.776 25.773,30.643 26.063,30.933 FB24.2@26.063,30.983 26.063,31.033 26.263,31.233 26.313,31.233 26.509,31.429 27.77,31.429 v1(28.11,31.769)
  Bottom Layer w0.25: v1(28.11,31.769) 28.137,31.769 28.451,31.455 28.926,31.455 U9.25@28.931,31.45
VDDO_5: C213.2 C214.2 FB27.2 U9.28 | length 4.7
  TopLayer w0.3: FB27.2@26.273,33.721 C213.2@27.465,33.721 v2(28.05,33.721)
  TopLayer w0.5: C214.2@25.738,32.21 25.738,33.094 26.073,33.43 FB27.2@26.073,33.48 26.073,33.521 FB27.2@26.273,33.721
  Bottom Layer w0.25: v2(28.05,33.721) 28.079,33.693 28.079,33.632 28.761,32.95 U9.28@28.931,32.95
VDDO_6: C164.2 C165.2 FB18.2 U9.43 | length 3.9
  TopLayer w0.5: C165.2@38.061,34.881 38.061,33.988 39.004,33.988 39.095,33.897 39.145,33.897 39.345,33.697 FB18.2@39.345,33.647 FB18.2@39.215,33.777
  Bottom Layer w0.25: U9.43@36.731,32.95 37.076,32.95 37.375,33.249 v1(37.375,33.848)
VDDO_7/8: C193.2 C194.2 FB22.2 U9.46 | length 4.3
  TopLayer w0.25: v1(37.683,31.035) 37.751,31.035 37.837,30.949 C193.2@38.303,30.949 39.046,30.949 FB22.2@39.345,31.248
  TopLayer w0.5: FB22.2@39.345,31.248 39.345,31.298 39.663,31.617 C194.2@39.663,32.457
  Bottom Layer w0.25: U9.46@36.731,31.45 37.269,31.45 v1(37.683,31.035)
VDDO_9/10: C205.2 C206.2 FB25.2 U9.51 | length 5.7
  TopLayer w0.25: v1(38.494,28.949) 38.494,28.605 38.439,28.549 38.439,28.277 39.14,27.576 39.15,27.576 39.175,27.551 C205.2@39.175,27.541
  TopLayer w0.5: v1(38.494,28.949) 38.638,28.806 FB25.2@39.398,28.806 39.452,28.859 39.452,29.947 C206.2@39.477,29.972
  Bottom Layer w0.25: U9.51@36.731,28.95 v1@38.494,28.95
pads on no net: FID1.0 FID2.0 FID3.0 FID4.0 FID5.0 FID6.0 H6.1 H7.1 U1. U1.32 U1.43 U1.44 U4.7 U4.10 U4.15 U4.16 U4.25 U9. U9.1 U9.2 U9.3 U9.18 U9.19 U9.23 U9.24 U9.26 U9.27 U9.32 U9.33 U9.35 U9.36 U9.47 U9.48 U9.52 U9.53 U9.56 U11.6 U15.2 U15.6 U15.8 U15.9 U15.10 U17.5 U17.6 U17.7 U17.8 U17.14 U17.15 U19.6 U21.6 U32.5 U32.14 U32.15 U33.2 U33.7 U33.10 U33.15 X1.2

## Polygon pours and split planes (outlines as drawn)
GND on Layer 1 "GND_L02_P217" (solid, remove dead copper, pour order 217): 0,83.2 0,52.613 4.438,48.175 6.575,48.175 7.377,47.373 7.377,32.4 3.369,28.392 3.369,14.904 11.6,6.673 23.077,6.673 24.282,5.468 24.282,2.743 30.211,2.743 30.26,2.793 30.26,3.97 30.507,4.217 31.628,4.217 32.083,3.761 32.083,2.801 32.208,2.676 32.224,2.693 47.854,2.693 47.854,2.941 48.236,3.324 69.365,3.324 69.676,3.635 69.676,83.2
no net on Layer 1 "NONET_L02_P220" (solid, remove dead copper, pour order 220): 70,83.2
no net on Layer 1 "NONET_L02_P219" (solid, remove dead copper, pour order 219): 0,83.225
no net on Layer 1 "NONET_L02_P163" (solid, pour order 163): 24.282,2.743
no net on Layer 1 "NONET_L02_P061" (solid, pour order 61): 55.829,25.984
no net on Layer 1 "NONET_L02_P039" (solid, pour order 39): 55.829,25.984
12V on TopLayer "12V_L01_P187" (solid, remove dead copper, pour order 187): 8.018,8.513 8.987,7.544 11.715,7.544 12.684,8.513 12.875,8.513 19.669,8.513 19.825,8.669 19.825,9.675 19.58,9.92 14.757,9.92 13.224,11.453 5.592,11.453 4.454,10.315 4.454,9.59 4.913,9.131 6.172,9.131 6.789,8.513
GND on TopLayer "GND_L01_P222" (solid, pour order 222): 16.829,17.681 17.945,16.565 17.881,16.501 17.881,13.292 16.042,11.453 12.189,11.453 5.059,11.453 4.569,11.943 4.569,17.231 5.019,17.681
3V3@1A_1 on TopLayer "3V3@1A_1_L01_P221" (solid, pour order 221): 44.615,25.477 42.409,25.477 39.562,22.629 30.143,22.629 29.784,22.271 29.784,20.273 30.131,19.927 40.311,19.927 44.767,24.383 44.767,25.326
PGND on TopLayer "PGND_L01_P218" (solid, remove dead copper, pour order 218): 24.55,2.55 22.328,2.55 21.597,3.281 0.132,3.281 0,3.413 0,8.462 6.129,8.462 7.591,7 12.675,7 19.784,7 20.359,6.425 23.191,6.425 24.55,5.066
1V8@1A on TopLayer "1V8@1A_L01_P210" (solid, remove dead copper, pour order 210): 13.932,29.377 14.365,29.462 20.908,29.462 20.908,34.651 24.431,34.604 25.532,34.604 25.676,34.46 25.676,26.903 25.145,26.373 18.35,26.373 17.104,25.127 13.292,25.127 12.992,25.427 12.992,26.704 13.932,27.644
3V6_DCDC on TopLayer "3V6_DCDC_L01_P211" (solid, remove dead copper, pour order 211): 4.121,18.274 5.363,18.274 5.957,17.681 15.841,17.681 15.841,19.376 15.459,19.758 11.009,19.758 10.242,20.526 10.242,27.587 9.492,28.337 9.492,30.83 9.734,31.072 11.157,31.072 12.392,32.306 12.392,37.223 14.647,39.478 14.647,43.014 14.163,43.498 9.327,43.498 2.944,37.115 2.944,19.052 3.697,18.299
1V8@1A on TopLayer "1V8@1A_L01_P216" (solid, remove dead copper, pour order 216): 42.199,30.607 41.658,30.607 41.658,29.072 41.943,28.787 42.243,28.787 42.268,28.762 42.268,27.031 41.687,26.45 40.923,26.45 40.679,26.694 40.679,27.701 40.073,28.307 40.073,29.444 40.073,30.773 40.073,34.251 40.22,34.397 42.213,34.397 42.369,34.241 42.369,33.741 42.145,33.517 41.495,33.517 41.495,31.711 41.764,31.442 42.034,31.442 42.199,31.277
RFGND on TopLayer "RFGND_L01_P200" (solid, remove dead copper, pour order 200): 46.916,52.401 47.691,51.625 59.184,51.625 63.95,56.391 63.95,72.425 53.725,82.65 0.925,82.75 0.925,74.375 0.925,67.01 8.525,59.41 41.179,59.41 41.179,57.39 42.695,55.875 46.075,55.875 46.916,55.034
NetC45_2 on TopLayer "NETC45_2_L01_P198" (solid, remove dead copper, pour order 198): 17.294,41.357 23.185,41.357 23.185,38.879 17.294,38.879
1V25@0A5 on TopLayer "1V25@0A5_L01_P208" (solid, remove dead copper, pour order 208): 16.597,31.659 16.842,31.819 17.714,31.819 20.354,31.819 20.974,31.199 20.974,29.98 20.563,29.57 17.002,29.57 16.597,29.975
NetC41_2 on TopLayer "NETC41_2_L01_P206" (solid, remove dead copper, pour order 206): 19.112,44.166 19.272,44.007 21.139,44.007 21.593,43.553 21.593,42.261 21.768,42.086 22.993,42.086 23.421,41.657 23.421,41.164 22.993,40.736 21.529,40.736 20.657,41.607 17.335,41.607 17.11,41.832 17.11,42.973 17.253,42.973 17.791,43.511 17.791,45.801 18.022,46.032 18.902,46.032 19.112,45.822
NetC64_2 on TopLayer "NETC64_2_L01_P205" (solid, remove dead copper, pour order 205): 13.242,33.369 14.79,33.369 14.952,33.208 14.952,32.983 15.227,32.708 15.778,32.708 16.141,32.344 16.141,29.799 15.905,29.563 13.741,29.563 13.242,30.061
3V3_MB on TopLayer "3V3_MB_L01_P203" (solid, remove dead copper, pour order 203): 47.931,8.683 50.063,8.683 50.063,7.38 47.931,7.38
3V3_MB on TopLayer "3V3_MB_L01_P202" (solid, remove dead copper, pour order 202): 55.636,8.451 57.132,8.451 57.403,8.18 57.403,7.303 57.247,7.147 55.497,7.147 55.271,7.374 55.271,8.384
PGND on TopLayer "NONET_L01_P174" (solid, remove dead copper, shelved, pour order 174): 24.3,2.55 22.888,2.55 cw(c22.888,3.038) 22.4,3.038 ccw(c22.238,3.038) 22.238,3.2 0.382,3.2 cw(c0.382,3.582) 0,3.582 0,57.658 cw(c2.337,57.658) 2.337,59.995 28.338,59.995 ccw(c28.338,62.158) 30.501,62.158 cw(c32.136,62.158) 32.136,63.793 38.766,63.793 cw(c38.766,61.693) 40.866,61.693 ccw(c41.331,61.693) 41.331,61.228 44.451,61.228 cw(c44.451,60.208) 45.471,60.208 45.471,42.799 cw(c44.5,42.799) 44.5,41.828 43.069,41.828 cw(c43.069,42.571) 42.326,42.571 42.326,51.41 ccw(c39.786,51.41) 39.786,53.95 27.188,53.95 ccw(c27.188,51.41) 24.648,51.41 24.648,46.071 ccw(c26.378,46.071) 26.378,44.341 27.709,44.341 cw(c27.709,41.828) 30.221,41.828 30.221,40.676 cw(c29.207,40.676) 29.207,39.662 22.532,39.662 ccw(c22.532,38.562) 21.432,38.562 21.432,34.716 ccw(c22.307,34.716) 22.307,33.841 cw(c22.307,33.047) 23.101,33.047 23.101,28.536 ccw(c24.914,28.536) 24.914,26.723 26.076,26.723 cw(c26.076,26.149) 26.65,26.149 26.65,22.181 cw(c26.028,22.181) 26.028,21.558 25.832,21.558 ccw(c25.832,20.725) 24.999,20.725 24.999,19.779 ccw(c25.961,19.779) 25.961,18.817 cw(c25.961,18.155) 26.623,18.155 26.623,14.975 ccw(c27.122,14.975) 27.122,14.475 36.133,14.475 cw(c36.133,13.897) 36.711,13.897 cw(c34.251,13.897) 34.251,11.436 26.44,11.436 cw(c26.44,12.517) 25.359,12.517 ccw(c25.122,12.517) 25.122,12.755 20.082,12.755 ccw(c20.082,12.05) 19.377,12.05 19.377,11.02 ccw(c20.374,11.02) 20.374,10.023 21.725,10.023 cw(c21.725,7.483) 24.265,7.483 24.265,5.773
no net on TopLayer "NONET_L01_P164" (solid, pour order 164): 12.46,7.215
no net on TopLayer "NONET_L01_P148" (solid, pour order 148): 4.55,7.173
no net on TopLayer "NONET_L01_P140" (solid, pour order 140): 40.146,35.111
no net on TopLayer "NONET_L01_P131" (solid, pour order 131): 29.229,31.596
no net on TopLayer "NONET_L01_P096" (solid, pour order 96): 23.846,22.618
no net on TopLayer "NONET_L01_P084" (solid, pour order 84): 23.846,22.618
1V25@1A on Bottom Layer "1V25@1A_L06_P118" (solid, remove dead copper, pour order 118): 47.535,39.099 ccw(c47.535,38.543) 46.978,38.543 46.978,37.51 ccw(c47.166,37.51) 47.166,37.322 47.62,37.322 cw(c47.62,36.991) 47.951,36.991 ccw(c48.518,36.991) 48.518,36.425 49.058,36.425 ccw(c49.058,36.575) 49.208,36.575 49.208,36.775 cw(c49.558,36.775) 49.558,37.125 50.058,37.125 ccw(c50.058,37.275) 50.208,37.275 50.208,37.693 ccw(c49.708,37.693) 49.708,38.193 cw(c49.708,38.6) 49.302,38.6 49.302,38.939 ccw(c49.142,38.939) 49.142,39.099
2V5@1A on Bottom Layer "2V5@1A_L06_P117" (solid, pour order 117): 54.79,37.788 54.753,37.826 54.753,38.178 54.727,38.178 54.399,38.506 53.23,38.506 52.917,38.193 52.917,37.321 ccw(c53.092,37.321) 53.092,37.146 54.664,37.146 ccw(c54.664,37.272) 54.79,37.272
+12 on Bottom Layer "+12_L06_P165" (solid, remove dead copper, pour order 165): 9.176,3.77 cw(c9.176,4.372) 8.574,4.372 8.574,5.306 cw(c9.094,5.306) 9.094,5.826 23.653,5.826 cw(c23.658,4.744) 24.74,4.75 24.74,0.559 cw(c24.431,0.559) 24.431,0.25 23.2,0.25 23.2,2.55 ccw(c21.98,2.55) 21.98,3.77
no net on Bottom Layer "NONET_L06_P195" (solid, remove dead copper, pour order 195): 38.715,45.7 38.715,47.095 39.275,47.655
2V5@1A on Bottom Layer "2V5@1A_L06_P128" (solid, remove dead copper, pour order 128): 47.646,37.184 cw(c47.646,36.878) 47.951,36.878 ccw(c48.405,36.878) 48.405,36.425 49.058,36.425 cw(c49.058,36.275) 49.208,36.275 49.208,35.925 cw(c48.908,35.925) 48.908,35.625 48.745,35.625 cw(c48.745,36.683) 47.997,35.935 47.925,36.007 ccw(c47.388,35.47) 47.388,36.229 cw(c47.388,36.567) 47.149,36.328 47.088,36.389 47.088,37.184
2V5@1A on Bottom Layer "2V5@1A_L06_P091" (solid, pour order 91): 52.678,27.432 52.678,26.646 52.785,26.539 54.619,26.539 54.719,26.639 54.719,27.779 54.208,28.29 54.208,28.888 54.125,28.972 52.981,28.972 52.908,28.899 52.908,28.775 52.908,27.663
1V25@1A on Bottom Layer "1V25@1A_L06_P149" (solid, pour order 149): 47.178,28.624 cw(c47.301,28.624) 47.301,28.747 47.868,28.747 ccw(c47.868,28.996) 48.117,28.996 cw(c48.546,28.996) 48.546,29.425 49.308,29.425 cw(c49.308,29.225) 49.508,29.225 ccw(c49.658,29.225) 49.658,29.075 49.725,29.075 cw(c49.725,28.494) 50.306,28.494 50.306,26.608 cw(c50.132,26.608) 50.132,26.434 49.275,26.434 cw(c49.275,26.728) 48.982,26.728 ccw(c48.358,26.728) 48.358,27.351 47.328,27.351 cw(c47.328,27.501) 47.178,27.501
no net on Bottom Layer "NONET_L06_P192" (solid, remove dead copper, pour order 192): 38.931,46.158
no net on Bottom Layer "NONET_L06_P126" (solid, pour order 126): 45.234,33.359
no net on Bottom Layer "NONET_L06_P125" (solid, pour order 125): 52.917,39.064
no net on Bottom Layer "NONET_L06_P115" (solid, pour order 115): 29.231,33.07
no net on Bottom Layer "NONET_L06_P099" (solid, pour order 99): 33.701,33.9
1V25@0A5 on Layer 2 "1V25@0A5_L03_P209" (solid, remove dead copper, pour order 209): 19.856,31.39 20.414,31.948 42.53,31.948 44.507,33.925 48.758,33.925 48.758,31.925 47.686,30.853 46.477,30.853 43.145,27.52 21.874,27.52 19.856,29.538
3V3@0A5 on Layer 2 "3V3@0A5_L03_P214" (solid, remove dead copper, pour order 214): 49.95,39.325 52.917,39.325 54.012,38.231 54.012,28.766 52.678,27.432 52.646,27.463 51.129,27.463 49.95,28.641 49.95,37.503
GND on Layer 4 "GND_L05_P215" (solid, remove dead copper, pour order 215): 25.822,40.783 27.955,42.916 27.955,52.782 29.063,53.889 36.357,53.889 38.827,56.359 46.235,56.359 47.375,55.219 47.351,55.195 47.351,50.41 45.121,48.179 45.121,41.41 45.445,41.085 47.328,41.085 cw(c47.328,40.374) 48.039,40.374 48.039,38.281 ccw(c49.495,38.281) 49.495,36.825 57.152,36.825 ccw(c57.152,37.681) 58.008,37.681 cw(c58.319,37.681) 58.011,37.722 58.011,39.929 cw(c58.72,39.929) 58.72,40.637 68.335,40.637 cw(c68.335,39.123) 69.85,39.123 69.85,6.304 cw(c67.31,6.304) 67.31,3.764 48.175,3.764 ccw(c48.175,3.324) 47.735,3.324 cw(c47.081,3.324) 47.081,2.67 32.652,2.67 cw(c32.652,3.238) 32.083,3.238 32.083,3.626 ccw(c31.403,3.626) 31.403,4.306 30.903,4.306 ccw(c30.903,3.484) 30.081,3.484 30.081,3.125 cw(c29.506,3.125) 29.506,2.55 25.5,2.55 cw(c25.5,3.15) 24.9,3.15 24.9,5.684 ccw(c23.855,5.684) 23.855,6.728 22.542,6.729 cw(c22.542,8.948) 20.323,8.948 20.323,9.061 ccw(c19.332,9.061) 19.332,10.052 18.792,10.052 cw(c18.792,11.728) 17.116,11.728 17.116,37.587 20.312,40.783
RFGND on Layer 4 "RFGND_L05_P161" (solid, remove dead copper, pour order 161): 25.576,41.64 27.736,43.799 27.736,53.298 28.72,54.282 28.923,54.079 36.605,54.079 38.885,56.359 46.532,56.359 47.225,55.666 47.225,51.15 44.796,48.721 44.796,40.659 43.519,39.382 43.519,28.151 47.706,23.964 54.998,23.964 57.232,25.968 57.232,29.142 57.232,36.148 58.641,37.558 58.641,41.353 59.691,42.402 69.575,42.402 69.575,82.475 1.975,82.475 1.2,81.7 1.2,54.268 13.828,41.64
1V25@1A on Layer 3 "1V25@1A_L04_P223" (solid, pour order 223): 46.135,41.815 48.7,39.25 48.7,29.7 49.737,28.663 49.737,26.738 49.269,26.27 46.369,26.27 43.277,29.362 43.277,41.051 44.042,41.815

## Other copper
TopLayer:
  text "Single ended  - 0,268 mm" at 79.225,78.666 h2
  text "Diff_100 - 0,268 mm - 0,26 mm" at 79.725,74.589 h2

## Silkscreen, mask and mechanical layers (free items; w line width, h text height)
PCI-SIG Outline:
  lines w0.1: 21.35,3.2 cw(c21.35,2.4) 22.15,2.4
Info:
  text "Zegar referencyjny z MB na dystrybutor na karcie CLKIN nie jest powiązonay długością" at -72.15,80.175 h2
  text "Sygnał CLK do FPGA oraz Sysref do złącza karty RF są powiązane" at -72.35,76.975 h2
  text "Sygna zegarowy z Zegara do ADC oraz SYSREF z zegara do ADC są powiązane" at -72.275,71.6 h2